# Altium PCB EVO373.PcbDoc
Units mm, origin at the board's own origin, x right, y up, seen from the top; angles counter-clockwise.
Board outline 40 x 55 mm, 2 copper layers (Top Layer, Bottom Layer), stack 1.571 mm thick; 33 components, 49 nets, 176 pads, 18 vias.
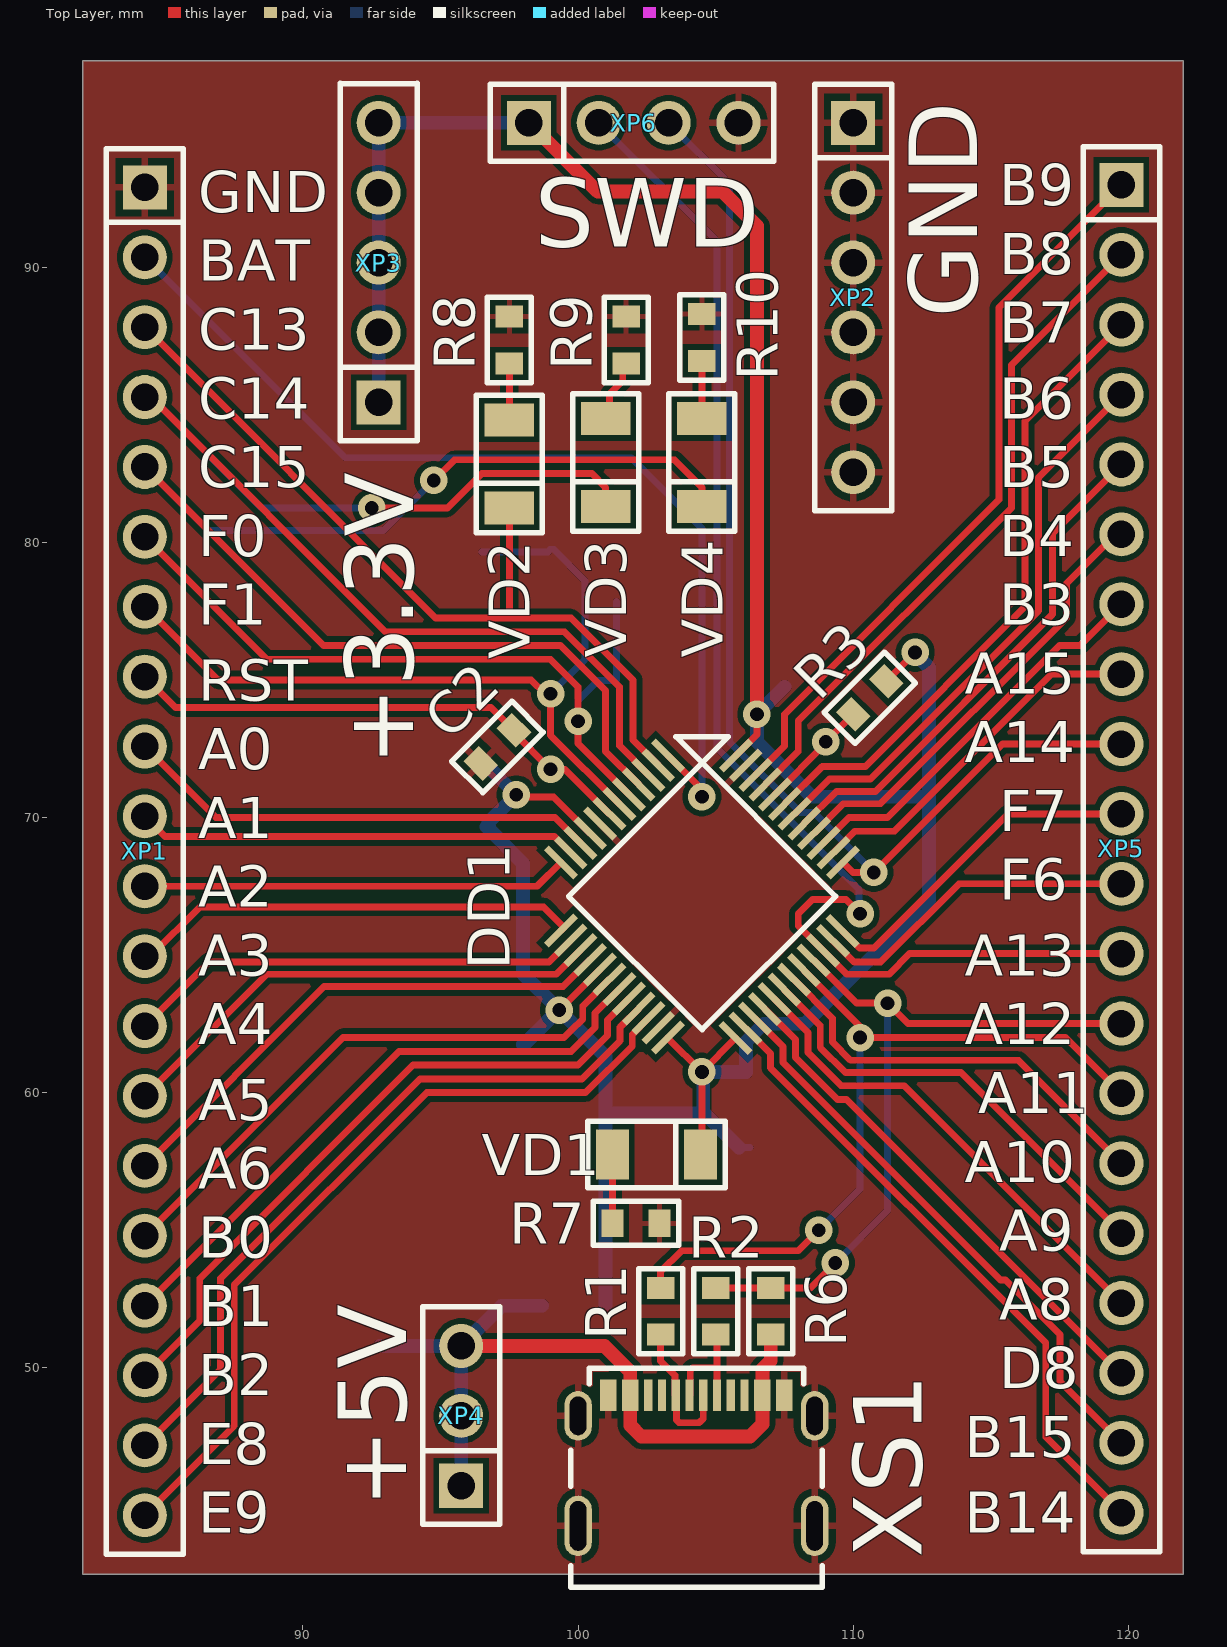
[diagram p0: Top Layer view]
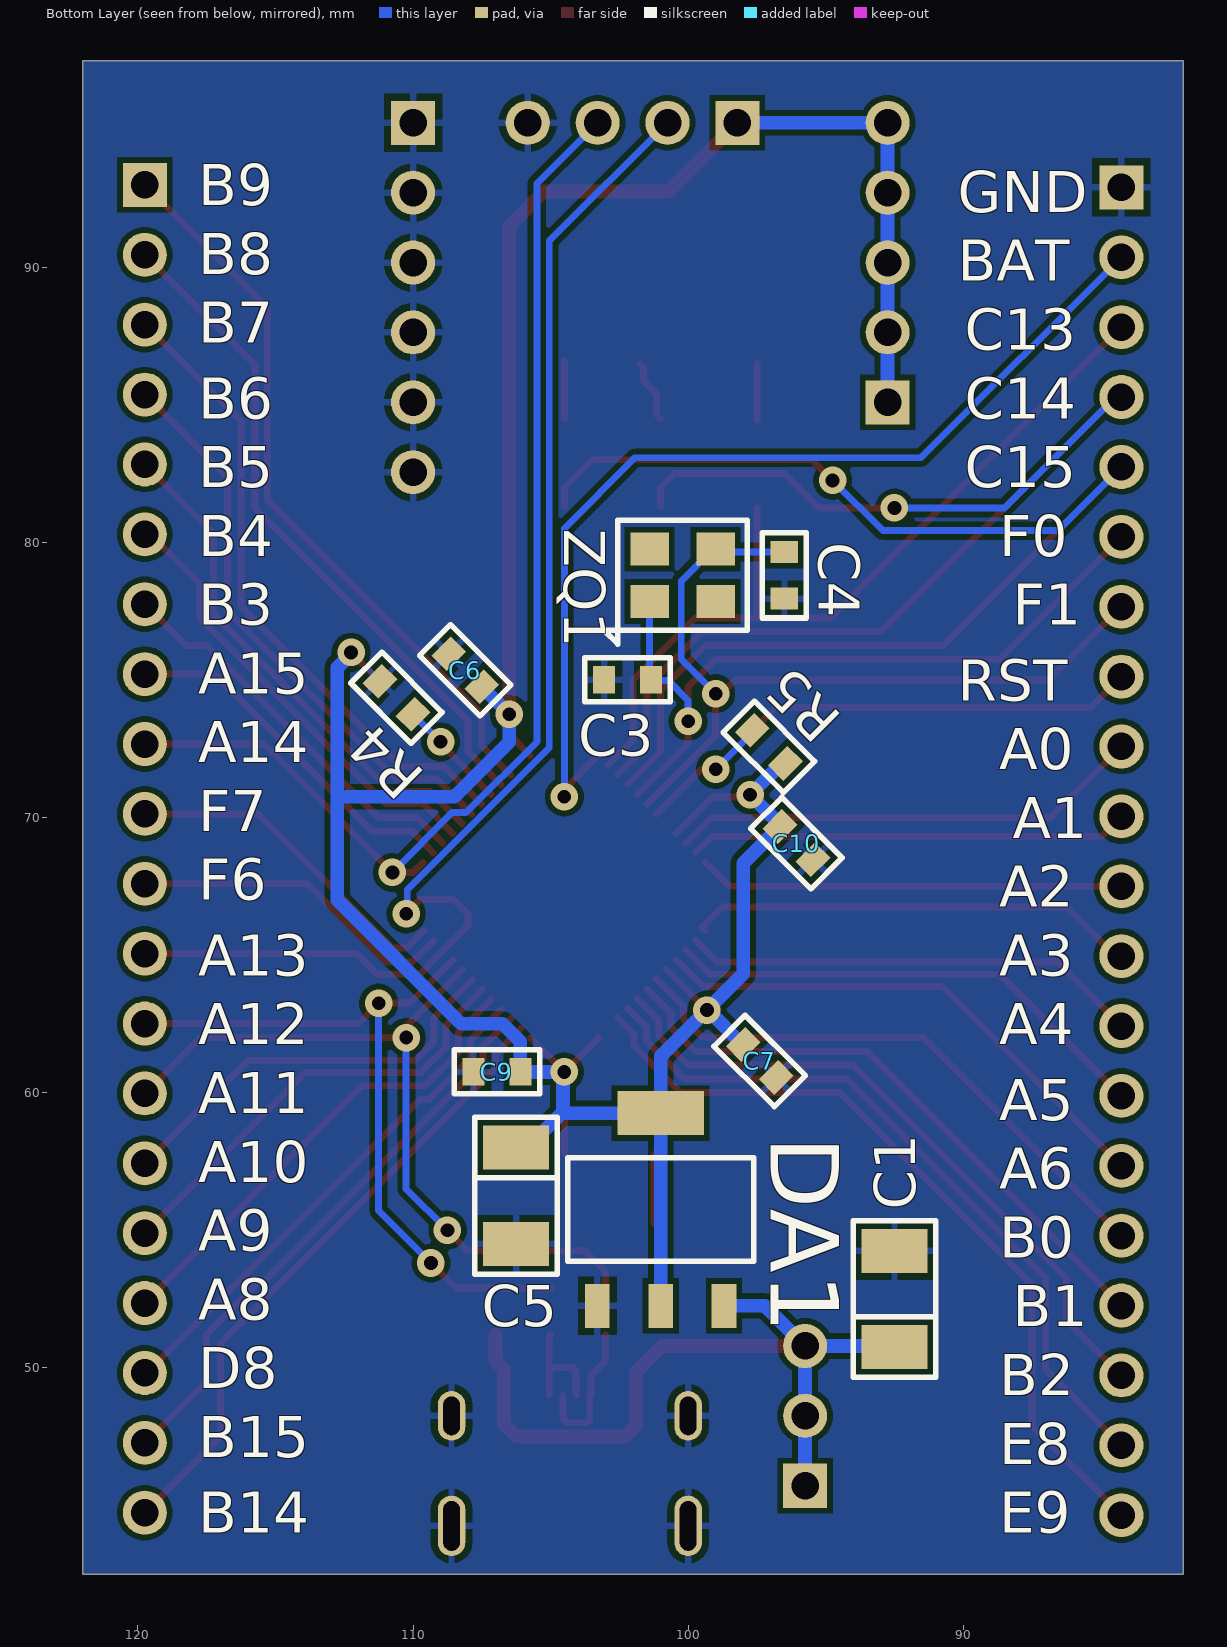
[diagram p1: Bottom Layer view, seen from below]
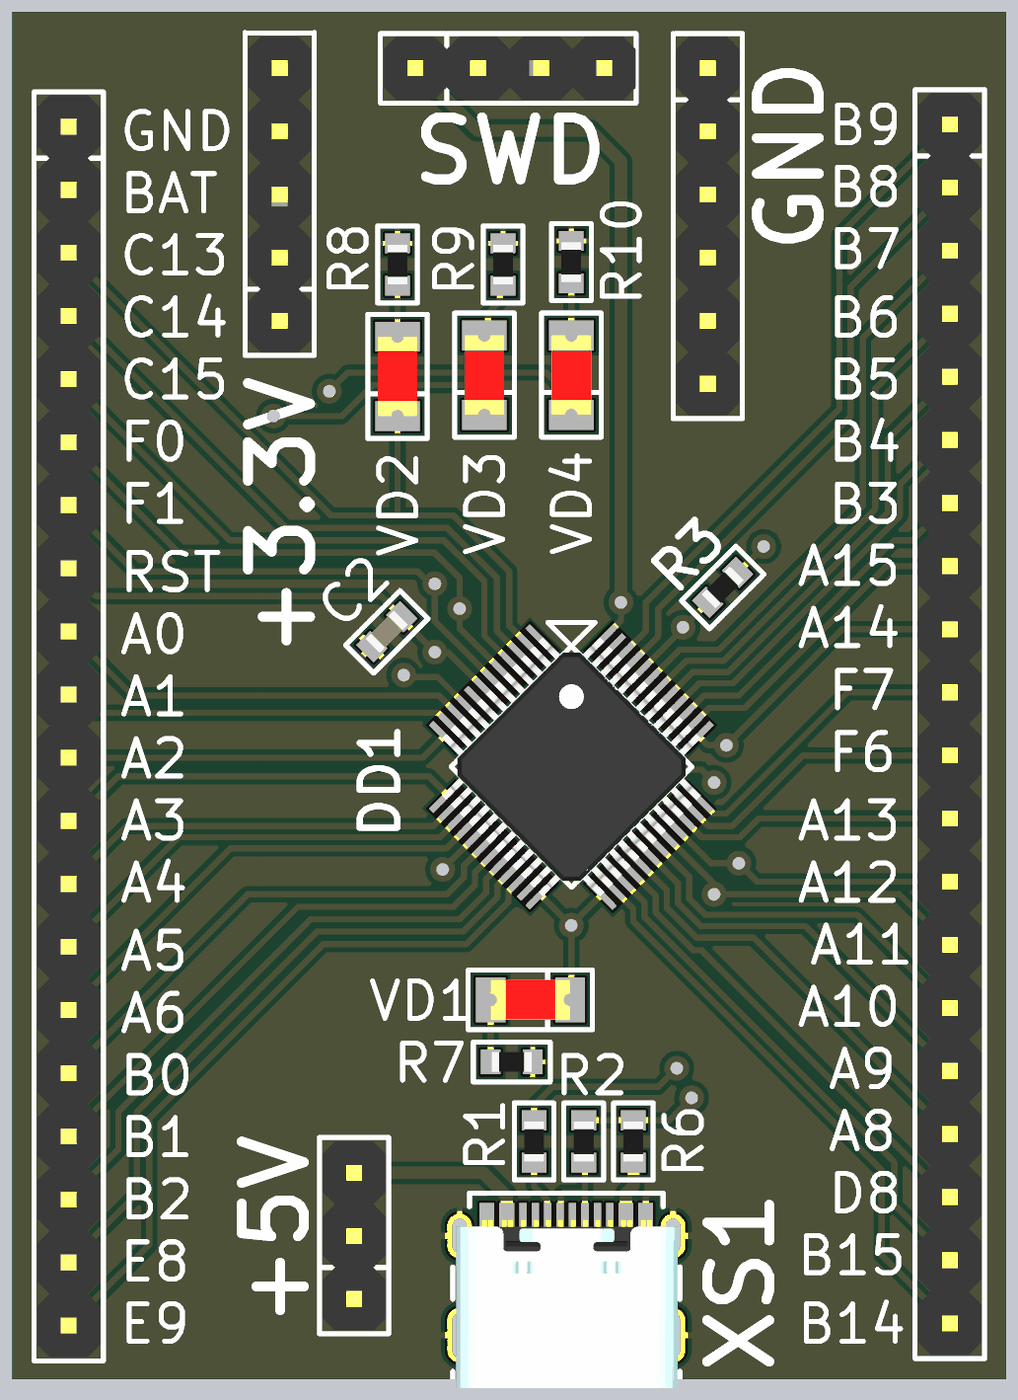
[diagram p2: 3D render of the assembled board from above, using the file's embedded part models]
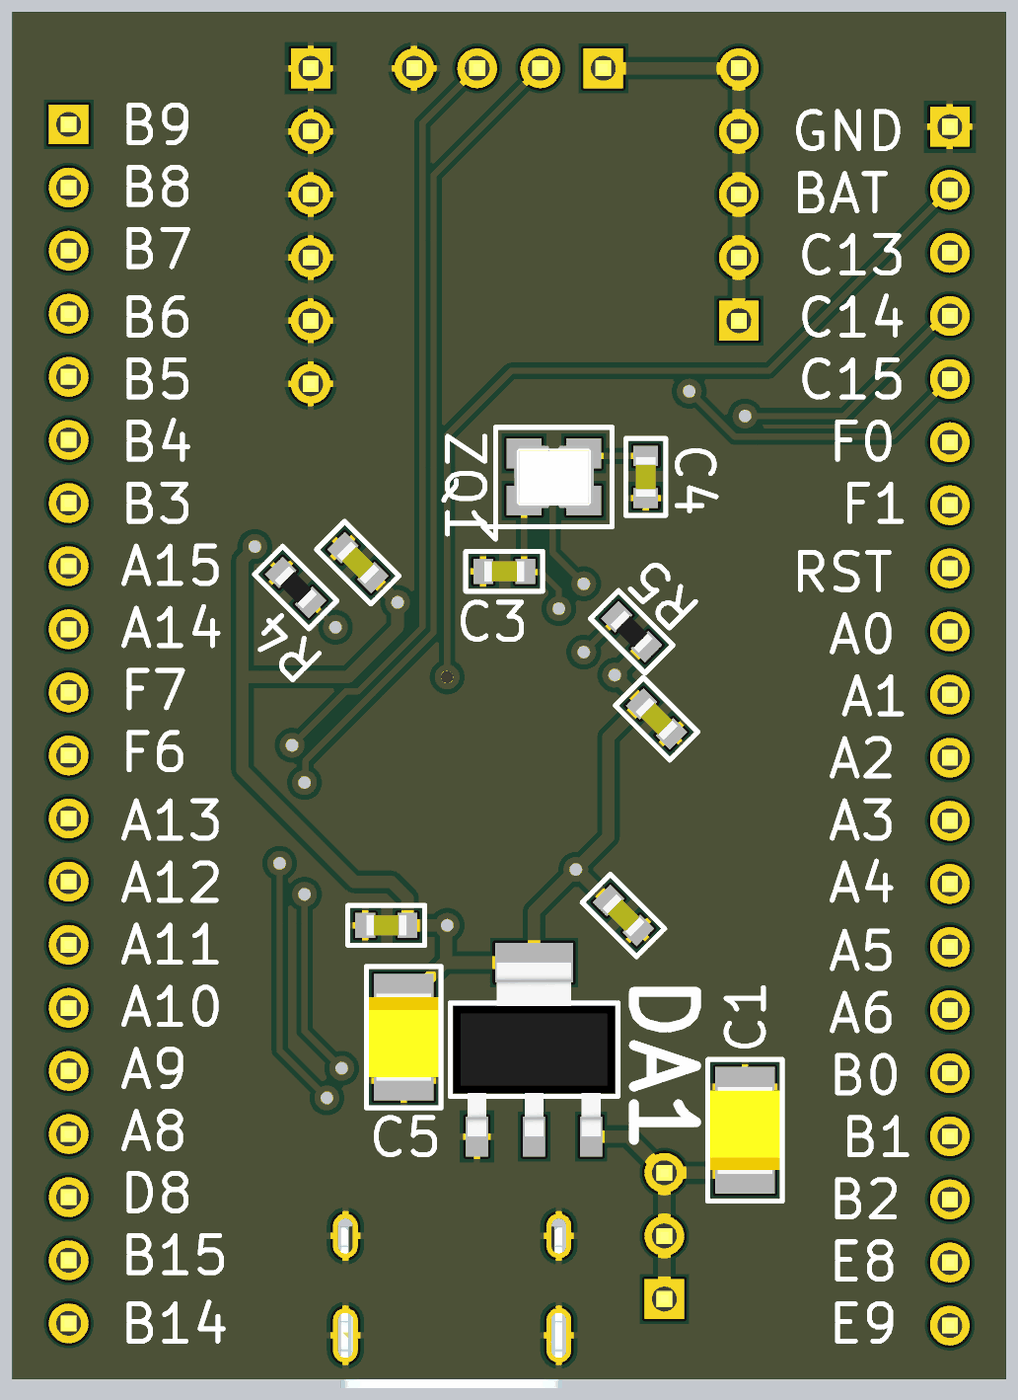
[diagram p3: 3D render of the assembled board from below, using the file's embedded part models]

## Layer stack, top to bottom
Top Solder: solder mask 0.0102, Solder Resist, Dk 3.5
Top Layer: signal copper 0.0356
Dielectric 1: dielectric 1.5, FR-4, Dk 4.8
Bottom Layer: signal copper 0.0356
Bottom Solder: solder mask 0.0102, Solder Resist, Dk 3.5

## Board outline
82,42.5 122,42.5 122,97.5 82,97.5

## Design rules (kind name [scope] priority, off if disabled: settings)
Clearance [All] p1: gap=0.2 ignorepadtopadclearanceinfootprint=FALSE except(0: Arc-Hole Track-Hole SMDPad-Hole THPad-Hole Via-Hole Fill-Hole Poly-Hole Region-Hole Text-Hole)
PolygonConnect [All] p1: connectstyle=Relief reliefconductorwidth=0.254 reliefentries=4 polygonreliefangle="90 Angle" airgapwidth=0.254
RoutingVias [All] p1: holewidth=0.5 width=1 viastyle="Through Hole" minholewidth=0.2 minwidth=0.8 maxholewidth=0.711 maxwidth=1.27
SolderMaskExpansion [All] p1: expansion=0.102 istentingtop=FALSE
UnRoutedNet [All] p1: checkbadconnections=TRUE
Width [All] p1: maxlimit=0.5 minlimit=0.2 preferedwidth=0.25 minimp=50.000000 maximp=50.000000 favimp=50.000000
29 further rules are at their usual default settings.

## Components (designator, comment, footprint, x,y, rotation, side; value= is the part's Value field where it differs from the comment)
C1 "10x16" CAP-TYPEB 92.5,50.75 r90 bottom
C2 "0.1" CAP-CHIP0603 96.5,72 r45 top
C3 "22" CAP-CHIP0603 103,75 r180 bottom
C4 "22" CAP-CHIP0603 96.5,78 r90 bottom
C5 "10x16" CAP-TYPEB 106.25,58 r270 bottom
C6 "0.1" CAP-CHIP0603 108.667,75.917 r225 bottom
C7 "0.1" CAP-CHIP0603 96.833,60.583 r45 bottom
C9 "0.01" CAP-CHIP0603 107.75,60.75 r180 bottom
C10 "0.01" CAP-CHIP0603 95.5,68.5 r45 bottom
DA1 "ADP3338AKC-3.3" SOT223 103.3,52.25 r180 bottom
DD1 "STM32F373C8T7" QFP-48-7x7 103.268,72.254 r315 top
R1 "20" RES-CHIP0603 103,51.25 r90 top
R2 "20" RES-CHIP0603 105,51.25 r90 top
R3 "1M" RES-CHIP0603 111.167,74.917 r225 top
R4 "10K" RES-CHIP0603 111.167,74.917 r225 bottom
R5 "1M" RES-CHIP0603 96.5,72 r45 bottom
R6 "4.7K" RES-CHIP0603 107,51.25 r90 top
R7 "510" RES-CHIP0603 102.9,55.25 r180 top
R8 "510" RES-CHIP0603 97.5,88.15 r270 top
R9 "510" RES-CHIP0603 101.75,88.15 r270 top
R10 "510" RES-CHIP0603 104.5,88.25 r270 top
VD1 "KP-3216EC" LED1206 104.45,57.75 r180 top
VD2 "KP-3216YC" LED1206 97.5,81.25 r90 top
VD3 "KP-3216SGC" LED1206 101,81.3 r90 top
VD4 "KP-3216MBC" LED1206 104.5,81.3 r90 top
XP1 "PLS-20" PLS-20S 84.25,92.9 r270 top
XP2 "GND" PLS-6S 110,95.25 r270 top
XP3 "+3.3V" PLS-5S 92.75,85.09 r90 top
XP4 "+5V" PLS-3S 95.75,45.71 r90 top
XP5 "PLS-20" PLS-20S 119.75,92.99 r270 top
XP6 "SWD" PLS-4S 98.21,95.25 r0 top
XS1 "2171790001" 2171790001 101.1,49 r0 top
ZQ1 "8MHz" ZQ-3225 101.4,77.85 r180 bottom

## Footprints (in the part's own frame and the unit in brackets; to place one, negate y for a bottom-side part, rotate by r counter-clockwise, add the part's x,y. Pads: shape width x height; smd on the part's side, far side on the other; paste and mask are expansions set on the pad)
2171790001 [mm] "USB TypeC USB2.0compatible"
  rect 0.6x1.15 smd: 1(0,0) 2(0.8,0) 11(5.6,0) 12(6.4,0)
  rect 0.3x1.15 smd: 3(1.45,0) 4(1.95,0) 5(2.45,0) 6(2.95,0) 7(3.45,0) 8(3.95,0) 9(4.45,0) 10(4.95,0)
  oval 1x2.2 hole 0.6 slot 1.8 at 90 deg: 13(-1.1,-4.75) 13(7.5,-4.75)
  oval 1x1.8 hole 0.6 slot 1.4 at 90 deg: 13(-1.1,-0.75) 13(7.5,-0.75)
  silkscreen extent -1.38,-6.98 7.78,0.97, body extent -1.24,-6.88 7.7,-0.12, height 3.26
CAP-CHIP0603 [mm] "Chip Capacitor 0603 E24"
  rect 0.8x1 smd: 1(-0.05,0) 2(1.65,0)
  silkscreen extent -0.75,-0.8 2.35,0.8, body extent 0,-0.4 1.6,0.4, height 0.46
CAP-TYPEB [mm] "Tantalum Chip Capacitor of TypeB (EIA 3528) case"
  rect 1.6x2.4 smd: 1(0,0) 2(3.5,0)
  silkscreen extent -1.1,-1.5 4.6,1.5, body extent 0,-1.4 3.5,1.4, height 1.9
LED1206 [mm] "Chip LED 1206"
  rect 1.2x1.8 smd: 1(0,0) 2(3.2,0)
  silkscreen extent -0.9,-1.2 4.1,1.2, body extent 0,-0.8 3.2,0.8, height 0.75
PLS-3S [mm] "Plug 3pin 2.54mm pitch"
  rect 1.6x1.6 / inner rect 1.5x1.5 / far side rect 1.6x1.6 hole 1: 1(0,0)
  round 1.6 / inner round 1.5 / far side round 1.6 hole 1: 2(2.54,0) 3(5.08,0)
  silkscreen extent -1.4,-1.4 6.5,1.4, body extent -1.27,-1.27 6.35,1.27, height 8.5
PLS-4S [mm] "Plug 4pin 2.54mm pitch"
  rect 1.6x1.6 / inner rect 1.5x1.5 / far side rect 1.6x1.6 hole 1: 1(0,0)
  round 1.6 / inner round 1.5 / far side round 1.6 hole 1: 2(2.54,0) 3(5.08,0) 4(7.62,0)
  silkscreen extent -1.4,-1.4 8.9,1.4, body extent -1.27,-1.27 8.89,1.27, height 8.5
PLS-5S [mm] "Plug 3pin 2.54mm pitch"
  rect 1.6x1.6 / inner rect 1.5x1.5 / far side rect 1.6x1.6 hole 1: 1(0,0)
  round 1.6 / inner round 1.5 / far side round 1.6 hole 1: 2(2.54,0) 3(5.08,0) 4(7.62,0) 5(10.16,0)
  silkscreen extent -1.4,-1.4 11.6,1.4, body extent -1.27,-1.27 11.43,1.27, height 8.5
PLS-6S [mm] "Plug 6pin 2.54mm pitch"
  rect 1.6x1.6 / inner rect 1.5x1.5 / far side rect 1.6x1.6 hole 1: 1(0,0)
  round 1.6 / inner round 1.5 / far side round 1.6 hole 1: 2(2.54,0) 3(5.08,0) 4(7.62,0) 5(10.16,0) 6(12.7,0)
  silkscreen extent -1.4,-1.4 14.1,1.4, body extent -1.27,-1.27 13.97,1.27, height 8.5
PLS-20S [mm] "Plug 20pin 2.54mm pitch"
  rect 1.6x1.6 / inner rect 1.5x1.5 / far side rect 1.6x1.6 hole 1: 1(0,0)
  round 1.6 / inner round 1.5 / far side round 1.6 hole 1: 2(2.54,0) 3(5.08,0) 4(7.62,0) 5(10.16,0) 6(12.7,0) 7(15.24,0) 8(17.78,0) 9(20.32,0) 10(22.86,0) 11(25.4,0) 12(27.94,0) 13(30.48,0) 14(33.02,0) 15(35.56,0) 16(38.1,0) 17(40.64,0) 18(43.18,0) 19(45.72,0) 20(48.26,0)
  silkscreen extent -1.4,-1.4 49.68,1.4, body extent -1.27,-1.27 49.53,1.27, height 8.5
QFP-48-7x7 [mm] "Thin QFP 7x7mm body 0.5mm pitch"
  rect 1.5x0.25 smd: 1(0,0) 2(0,-0.5) 3(0,-1) 4(0,-1.5) 5(0,-2) 6(0,-2.5) 7(0,-3) 8(0,-3.5) 9(0,-4) 10(0,-4.5) 11(0,-5) 12(0,-5.5) 25(9,-5.525) 26(9,-5.025) 27(9,-4.525) 28(9,-4.025) 29(9,-3.525) 30(9,-3.025) 31(9,-2.525) 32(9,-2.025) 33(9,-1.525) 34(9,-1.025) 35(9,-0.525) 36(9,-0.025)
  rect 0.25x1.5 smd: 13(1.75,-7.25) 14(2.25,-7.25) 15(2.75,-7.25) 16(3.25,-7.25) 17(3.75,-7.25) 18(4.25,-7.25) 19(4.75,-7.25) 20(5.25,-7.25) 21(5.75,-7.25) 22(6.25,-7.25) 23(6.75,-7.25) 24(7.25,-7.25) 37(7.25,1.75) 38(6.75,1.75) 39(6.25,1.75) 40(5.75,1.75) 41(5.25,1.75) 42(4.75,1.75) 43(4.25,1.75) 44(3.75,1.75) 45(3.25,1.75) 46(2.75,1.75) 47(2.25,1.75) 48(1.75,1.75)
  silkscreen extent -0.28,-6.17 7.92,2.03, body extent 0,-7.25 9,1.75, height 1.71
RES-CHIP0603 [mm] "Chip Resistor 0603 E24"
  rect 0.8x1 smd: 1(-0.05,0) 2(1.65,0)
  silkscreen extent -0.75,-0.8 2.35,0.8, body extent 0,-0.4 1.6,0.4, height 0.46
SOT223 [mm] "SOT223 case"
  rect 0.9x1.6 smd: 1(0,0) 2(2.3,0) 3(4.6,0)
  rect 3.15x1.6 smd: 2(2.3,7)
  silkscreen extent -1.08,1.62 5.69,5.38, body extent -0.95,0 5.55,7, height 1.6
ZQ-3225 [mm] "Generator 4pin 3.2x2.5mm"
  rect 1.4x1.2 smd: 1(0,0) 2(2.4,0) 3(2.4,1.9) 4(0,1.9)
  silkscreen extent -1.65,-1.55 3.55,2.95, body extent -0.4,-0.3 2.8,2.2, height 1.05

## Part data
C1 C5: library part CAP-TypeB, "Tantalum Capacitor TypeB size", Manufacturer=KEMET, FullName=T491BxxxKxxxAT, TY=АЖЯР.673546.007ТУ
C2 C3 C4 C6 C7 C9 C10: library part CAP-NP0-0603, "Chip Capacitor NP0 (C0G) 0603 size", Manufacturer=KEMET, FullName=C0603CxxxJxGACT, TY=АЖЯР.673511.004ТУ
DA1: "LDO linear 3.3V regulator", Manufacturer="Analog Devices", ChipDip=8046220726, FullName=ADP3338AKC-3.3
DD1: "Cortex-M4, 12bit ADC, 12bit DAC, RTC, CAN, USB", Manufacturer="ST Microelectronics", ChipDip=9000237665, FullName=STM32F373C8T7
R1 R2 R3 R4 R5 R6 R7 R8 R9 R10: library part CHIP-0603-E24, "Chip resistor 0603 E24 tolerance", Manufacturer=Bourns, FullName=CR0603-JW-, TY="ШКАБ.434110.002 ТУ"
VD1: "Red LED Chip 1206", Manufacturer=Kingbright, ChipDip=8008595251, FullName=KP-3216EC
VD2: "Yellow LED Chip 1206", Manufacturer=Kingbright, ChipDip=8001937240, FullName=KP-3216YC
VD3: "Green LED Chip 1206", Manufacturer=Kingbright, ChipDip=8001779374, FullName=KP-3216SGC
VD4: "Blue LED Chip 1206", Manufacturer=Kingbright, ChipDip=8001946453, FullName=KP-3216MBC
XP1 XP5: "Plug 24pin 2mm pitch", Manufacturer=Connfly, ChipDip=379650257, FullName=DS1021-1*20
XP2: library part PLS-6, "Plug 6pin 2mm pitch", Manufacturer=Connfly, ChipDip=389965514, FullName=DS1021-1*6
XP3: library part PLS-5, "Plug 5pin 2mm pitch", Manufacturer=Connfly, ChipDip=707998901, FullName=DS1021-1*5
XP4: library part PLS-3, "Plug 3pin 2.54mm pitch", Manufacturer=Connfly, ChipDip=132511368, FullName=DS1021-1*3
XP6: library part PLS-4, "Plug 4pin 2mm pitch", Manufacturer=Connfly, ChipDip=174993133, FullName=DS1021-1*4
XS1: "Horizontal USB TypeC USB 2.0 compatible socket", Manufacturer=Molex, ChipDip=8008902888, FullName=2171790001
ZQ1: library part ZQ-3225, "SMD quartz generator 3.2x2/5mm", FullName=SMX, TY={TY}

## Via types
v1: diameter 1/1 (per signal layer), hole 0.5, Top Layer to Bottom Layer, tented both sides, 18 vias

## Nets (pads, with @x,y where several pads share a name; then routed paths per layer and width w, separated by ;. In a path a pad name is that pad's centre, name@x,y a point inside that pad or via, vN(x,y) a via of type N, cw(c..) or ccw(c..) an arc to the next point about the centre after c; other vN are vias at no path point)
3V3: C5.1 C6.2 C7.2 C9.2 C10.2 DA1.2 DD1.9 DD1.17 DD1.24 DD1.25 DD1.48 R3.1 R5.1 VD1.1 XP3.1 XP3.2 XP3.3 XP3.4 XP3.5 XP6.1 | length 120.4
  Top Layer w0.25: v1(97.75,70.825) 97.825,70.75 99.115,70.75 DD1.9 ; v1(99.317,63) DD1.17 ; DD1.24 103.258,61.992 v1(104.5,60.75) ; VD1.1 104.5,57.8 v1(104.5,60.75) ; DD1.25 105.729,61.979 v1(104.5,60.75) ; DD1.48 106.5,73.011 v1(106.5,73.75) ; R3.1@111.035,75.285 111.174,75.147 111.397,75.147 v1(112.25,76)
  Top Layer w0.5: XP6.1 100.71,92.75 105.25,92.75 106.5,91.5 v1(106.5,73.75)
  Bottom Layer w0.25: v1(104.5,60.75) v1@104.55,60.75 ; 104.55,59.25 104.6,59.25 ; C5.1@105.85,58 C5.1
  Bottom Layer w0.5: XP3.1 XP3.2 XP3.3 XP3.4 XP3.5 XP6.1 ; R5.1 96.61,71.965 v1(97.75,70.825) 96.735,69.81 96.735,69.7 C10.2@96.773,69.662 ; C10.2 98,68.333 98,64.317 v1(99.317,63) ; C7.2 98.034,61.75 99.284,63 v1(99.317,63) ; DA1.2@101,52.25 DA1.2@101,59.25 ; 104.6,59.25 C5.1@105.85,58 ; C6.2 v1(106.5,73.75) 106.5,72.75 108.5,70.75 112.75,70.75 ; v1(112.25,76) 112.25,75.957 112.75,75.457 112.75,70.75 ; v1(99.317,63) 101,61.317 DA1.2@101,59.25 ; DA1.2@101,59.25 104.55,59.25 104.55,60.75 C9.2 106.1,61.85 106.75,62.5 108.25,62.5 112.75,67 112.75,70.75
+5: C1.1 DA1.3 R6.1 XP4.1 XP4.2 XP4.3 XS1.2 XS1.11 | length 28.7
  Top Layer w0.5: XP4.3 100.96,50.79 101.9,49.85 XS1.2 101.9,47.896 102.296,47.5 106.25,47.5 106.7,47.95 XS1.11 106.7,49.95 107,50.25 R6.1
  Bottom Layer w0.25: C1.1@92.75,50.75 C1.1@92.79,50.79
  Bottom Layer w0.5: C1.1@92.79,50.79 XP4.3 97.21,52.25 DA1.3 ; XP4.1@95.75,45.46 XP4.1 XP4.2 XP4.3@95.75,50.54
BAT: DD1.1 XP1.2 | length 36.1
  Top Layer w0.25: DD1.1 104.5,71.022 v1(104.5,70.75)
  Bottom Layer w0.25: XP1.2 91.535,83.075 101.925,83.075 104.5,80.5 v1(104.5,70.75)
GND: C1.2 C2.1 C3.1 C4.1 C5.2 C6.1 C7.1 C9.1 C10.1 DA1.1 DD1.8 DD1.23 DD1.47 R4.1 R7.1 R8.1 R9.1 R10.1 XP1.1 XP2.1 XP2.2 XP2.3 XP2.4 XP2.5 XP2.6 XP6.4 XS1.1 XS1.12 XS1.13
NetDD1_44: DD1.44 R3.2 R4.2 | length 5.6
  Top Layer w0.25: DD1.44 109,72.683 v1(109,72.75) 109.889,73.639 109.889,73.778 R3.2@109.833,73.833
  Bottom Layer w0.25: v1(109,72.75) R4.2
NetR1_1: R1.1 XS1.5 XS1.7 | length 5.3
  Top Layer w0.25: R1.1 103,50.25 103.525,49.725 103.525,49.025 XS1.5 103.575,48.975 103.575,48.096 103.671,48 104.404,48 104.55,48.146 XS1.7
NetR2_1: R2.1 XS1.6 XS1.8 | length 4.2
  Top Layer w0.25: XS1.6 104.075,49.025 104.075,49.904 104.171,50 104.975,50 105.05,50.075 ; R2.1 105.05,51.15 105.05,50.075 ; XS1.8 105.05,50.075
NetR7_2: R7.2 VD1.2 | length 2.5
  Top Layer w0.25: R7.2 VD1.2
NetR8_2: R8.2 VD2.2 | length 2
  Top Layer w0.25: VD2.2 R8.2
NetR9_2: R9.2 VD3.2 | length 2.3
  Top Layer w0.25: VD3.2 101.146,84.646 101.146,85.396 101.621,85.871 101.621,86.371 R9.2
NetR10_2: R10.2 VD4.2 | length 2.1
  Top Layer w0.25: VD4.2 R10.2
NRST: C2.2 DD1.7 R5.2 XP1.8 | length 21
  Top Layer w0.25: XP1.8 85.37,74 96.833,74 C2.2 ; C2.2@97.625,73.125 v1(99,71.75) 99.529,71.75 DD1.7
  Bottom Layer w0.25: R5.2 97.667,73.083 v1(99,71.75)
PA0: DD1.10 XP1.9 | length 17.3
  Top Layer w0.25: XP1.9 86.83,70 99.158,70 DD1.10
PA1: DD1.11 XP1.10 | length 16
  Top Layer w0.25: XP1.10 84.981,69.309 99.142,69.309 DD1.11
PA2: DD1.12 XP1.11 | length 15.5
  Top Layer w0.25: XP1.11 98.5,67.5 99.372,68.372 DD1.12
PA3: DD1.13 XP1.12 | length 16.5
  Top Layer w0.25: XP1.12 84.46,64.96 86.25,66.75 98.75,66.75 99.494,66.006 DD1.13
PA4: DD1.14 XP1.13 | length 16.8
  Top Layer w0.25: XP1.13 86.58,64.75 98.946,64.75 DD1.14
PA5: DD1.15 XP1.14 | length 18
  Top Layer w0.25: XP1.14 88.67,64.3 99.203,64.3 DD1.15
PA6: DD1.16 XP1.15 | length 19.3
  Top Layer w0.25: XP1.15 90.76,63.85 99.46,63.85 DD1.16
PA8: DD1.29 XP5.17 | length 17.6
  Top Layer w0.25: DD1.29 108.35,62.187 108.35,61.46 109.56,60.25 111.85,60.25 XP5.17
PA9: DD1.30 XP5.16 | length 16.4
  Top Layer w0.25: DD1.30 108.8,62.444 108.8,61.647 109.722,60.725 113.915,60.725 XP5.16
PA10: DD1.31 XP5.15 | length 15.2
  Top Layer w0.25: DD1.31 109.25,62.701 109.25,61.833 109.908,61.175 116.005,61.175 XP5.15
PA11/U-: DD1.32 R1.2 XP5.14 | length 28.2
  Top Layer w0.25: R1.2 103,53.5 103.75,54.25 108,54.25 v1(108.75,55) ; DD1.32 110.25,62.408 v1(110.25,62) 117.72,62 XP5.14
  Bottom Layer w0.25: v1(108.75,55) 110.25,56.5 v1(110.25,62)
PA12/U+: DD1.33 R2.2 R6.2 XP5.13 | length 27.1
  Top Layer w0.25: R2.2 R6.2 108.441,52.9 v1(109.347,53.806) ; DD1.33 110.115,63.25 v1(111.25,63.25) 111.99,62.51 XP5.13
  Bottom Layer w0.25: v1(109.347,53.806) 111.25,55.709 v1(111.25,63.25)
PA13/PGD: DD1.34 XP5.12 XP6.2 | length 48.6
  Top Layer w0.25: v1(110.25,66.5) 110.25,66.517 109.743,67.024 108.524,67.024 108,66.5 108,66.072 DD1.34 109.772,64.3 111.3,64.3 112.05,65.05 XP5.12
  Bottom Layer w0.25: XP6.2 105.05,90.95 105.05,72.533 110.208,67.375 110.208,66.542 v1(110.25,66.5)
PA14/PGC: DD1.37 XP5.9 XP6.3 | length 42.8
  Top Layer w0.25: DD1.37 109.997,68 v1(110.75,68) 115.42,72.67 XP5.9
  Bottom Layer w0.25: XP6.3 105.5,93.04 105.5,72.75 108.075,70.175 108.575,70.175 v1(110.75,68)
PA15: DD1.38 XP5.8 | length 13.2
  Top Layer w0.25: DD1.38 110.06,69.5 111.5,69.5 117.21,75.21 XP5.8
PB0: DD1.18 XP1.16 | length 21
  Top Layer w0.25: XP1.16 91.45,62 99.484,62 99.734,62.25 99.75,62.25 100.17,62.67 100.17,63.146 DD1.18
PB1: DD1.19 XP1.17 | length 22.3
  Top Layer w0.25: XP1.17 93.49,61.5 99.75,61.5 100.62,62.37 100.62,62.889 DD1.19
PB2: DD1.20 XP1.18 | length 24.5
  Top Layer w0.25: XP1.18 86.25,51.72 86.25,53.25 94,61 100,61 101.07,62.07 101.07,62.632 DD1.20
PB3: DD1.39 XP5.7 | length 14.4
  Top Layer w0.25: DD1.39 109.853,70 111.25,70 117.5,76.25 118.25,76.25 XP5.7
PB4: DD1.40 XP5.6 | length 16.4
  Top Layer w0.25: DD1.40 109.646,70.5 111,70.5 117.75,77.25 117.75,78.5 119.54,80.29 XP5.6
PB5: DD1.41 XP5.5 | length 18.7
  Top Layer w0.25: DD1.41 109.388,70.95 110.814,70.95 117.25,77.386 117.25,80.33 XP5.5
PB6: DD1.42 XP5.4 | length 21
  Top Layer w0.25: DD1.42 109.131,71.4 110.627,71.4 116.739,77.511 116.739,82.359 XP5.4
PB7: DD1.43 XP5.3 | length 23.4
  Top Layer w0.25: DD1.43 108.874,71.85 110.441,71.85 116.25,77.659 116.25,84.41 XP5.3
PB8/CRX: DD1.45 XP5.2 | length 24.6
  Top Layer w0.25: DD1.45 108,72.39 108,73.5 115.75,81.25 115.75,86.45 XP5.2
PB9/CTX: DD1.46 XP5.1 | length 27
  Top Layer w0.25: DD1.46 107.5,72.597 107.5,73.75 115.3,81.55 115.3,88.54 XP5.1
PB14: DD1.26 XP5.20 | length 23.3
  Top Layer w0.25: DD1.26 107,61.415 107,60.901 117,50.901 117,47.48 XP5.20
PB15: DD1.27 XP5.19 | length 21
  Top Layer w0.25: DD1.27 107.45,61.672 107.45,61.088 115.356,53.182 115.535,53.182 117.514,51.204 117.514,49.506 XP5.19
PC13: DD1.2 VD2.1 XP1.3 | length 30.5
  Top Layer w0.25: XP1.3 94.82,77.25 97.5,77.25 ; VD2.1 97.5,77.25 ; DD1.2 102,72.815 102,75 99.75,77.25 97.5,77.25
PC14: DD1.3 VD3.1 XP1.4 | length 45.1
  Top Layer w0.25: XP1.4 84.47,85.28 93,76.75 99.5,76.75 101.5,74.75 101.5,72.608 DD1.3 ; v1(92.5,81.25) 95.25,81.25 96.5,82.5 100.5,82.5 101,82 VD3.1
  Bottom Layer w0.25: XP1.4 84.47,85.28 88.5,81.25 v1(92.5,81.25)
PC15: DD1.4 VD4.1 XP1.5 | length 47.4
  Top Layer w0.25: XP1.5 90.74,76.25 99.364,76.25 101,74.614 101,72.4 DD1.4 ; v1(94.75,82.25) 95.5,83 103.5,83 104.5,82 VD4.1
  Bottom Layer w0.25: XP1.5 86.565,80.425 92.925,80.425 v1(94.75,82.25)
PD8: DD1.28 XP5.18 | length 18.8
  Top Layer w0.25: DD1.28 107.9,61.93 107.9,61.274 109.424,59.75 109.75,59.75 119.69,49.81 XP5.18
PE8: DD1.21 XP1.19 | length 26.8
  Top Layer w0.25: XP1.19 87,49.93 87,53.25 94.25,60.5 100.136,60.5 101.52,61.884 101.52,62.375 DD1.21
PE9: DD1.22 XP1.20 | length 29
  Top Layer w0.25: XP1.20 87.5,47.89 87.5,53 94.5,60 100.273,60 101.97,61.698 101.97,62.118 DD1.22
PF0: C3.2 DD1.5 XP1.6 ZQ1.1 | length 27.9
  Top Layer w0.25: XP1.6 88.7,75.75 99,75.75 100,74.75 v1(100,73.5) 100,72.693 DD1.5
  Bottom Layer w0.25: v1(100,73.5) 100,74.25 100.721,74.971 101.321,74.971 C3.2 ; C3.2@101.4,75 ZQ1.1
PF1: C4.2 DD1.6 XP1.7 ZQ1.3 | length 30
  Top Layer w0.25: XP1.7 86.91,75 98.297,75 98.797,74.5 v1(99,74.5) 99,72.986 DD1.6
  Bottom Layer w0.25: C4.2 98.9,79.65 ZQ1.3 99.1,79.75 100.25,78.6 100.25,75.75 v1(99,74.5)
PF6: DD1.35 XP5.11 | length 12
  Top Layer w0.25: DD1.35 110.029,64.75 111,64.75 113.84,67.59 XP5.11
PF7: DD1.36 XP5.10 | length 12.4
  Top Layer w0.25: DD1.36 110.236,65.25 110.75,65.25 115.63,70.13 XP5.10
pads on no net: XS1.3 XS1.4 XS1.9 XS1.10 ZQ1.2 ZQ1.4

## Polygon pours and split planes (outlines as drawn)
GND on Bottom Layer "GND_L02_P000" (solid, pour order 0): 82,97.5 122,97.5 122,42.5 82,42.5
GND on Top Layer "GND_L01_P001" (solid, pour order 1): 82,97.5 82,42.5 122,42.5 122,97.5

## Silkscreen, mask and mechanical layers (free items; w line width, h text height)
Top Overlay:
  text "B9" at 115.301,92.25 h1.5
  text "GND" at 86.2,92 h1.5
  text "B8" at 115.301,89.75 h1.5
  text "BAT" at 86.2,89.5 h1.5
  text "B7" at 115.301,87.25 h1.5
  text "C13" at 86.2,87 h1.5
  text "C14" at 86.2,84.5 h1.5
  text "B6" at 115.301,84.5 h1.5
  text "C15" at 86.2,82 h1.5
  text "B5" at 115.301,82 h1.5
  text "F0" at 86.2,79.5 h1.5
  text "B4" at 115.301,79.5 h1.5
  text "F1" at 86.2,77 h1.5
  text "B3" at 115.301,77 h1.5
  text "A15" at 114.051,74.5 h1.5
  text "RST" at 86.2,74.25 h1.5
  text "A14" at 114.051,72 h1.5
  text "A0" at 86.2,71.75 h1.5
  text "F7" at 115.301,69.5 h1.5
  text "A1" at 86.2,69.25 h1.5
  text "F6" at 115.301,67 h1.5
  text "A2" at 86.2,66.75 h1.5
  text "A3" at 86.2,64.25 h1.5
  text "A13" at 114.051,64.25 h1.5
  text "A4" at 86.2,61.75 h1.5
  text "A12" at 114.051,61.75 h1.5
  text "A11" at 114.551,59.25 h1.5
  text "A5" at 86.2,59 h1.5
  text "A10" at 114.051,56.75 h1.5
  text "A6" at 86.2,56.5 h1.5
  text "A9" at 115.301,54.25 h1.5
  text "B0" at 86.2,54 h1.5
  text "A8" at 115.301,51.75 h1.5
  text "B1" at 86.2,51.5 h1.5
  text "D8" at 115.301,49.25 h1.5
  text "B2" at 86.2,49 h1.5
  text "B15" at 114.051,46.75 h1.5
  text "E8" at 86.2,46.5 h1.5
  text "E9" at 86.2,44 h1.5
  text "B14" at 114.051,44 h1.5
Bottom Overlay:
  text "B9" at 117.8,92.25 h1.5
  text "GND" at 90.199,92 h1.5
  text "B8" at 117.8,89.75 h1.5
  text "BAT" at 90.199,89.5 h1.5
  text "B7" at 117.8,87.25 h1.5
  text "C13" at 89.949,87 h1.5
  text "C14" at 89.949,84.5 h1.5
  text "B6" at 117.8,84.5 h1.5
  text "C15" at 89.949,82 h1.5
  text "B5" at 117.8,82 h1.5
  text "F0" at 88.699,79.5 h1.5
  text "B4" at 117.8,79.5 h1.5
  text "F1" at 88.199,77 h1.5
  text "B3" at 117.8,77 h1.5
  text "A15" at 117.8,74.5 h1.5
  text "RST" at 90.199,74.25 h1.5
  text "A14" at 117.8,72 h1.5
  text "A0" at 88.699,71.75 h1.5
  text "F7" at 117.8,69.5 h1.5
  text "A1" at 88.199,69.25 h1.5
  text "F6" at 117.8,67 h1.5
  text "A2" at 88.699,66.75 h1.5
  text "A3" at 88.699,64.25 h1.5
  text "A13" at 117.8,64.25 h1.5
  text "A4" at 88.699,61.75 h1.5
  text "A12" at 117.8,61.75 h1.5
  text "A11" at 117.8,59.25 h1.5
  text "A5" at 88.699,59 h1.5
  text "A10" at 117.8,56.75 h1.5
  text "A6" at 88.699,56.5 h1.5
  text "A9" at 117.8,54.25 h1.5
  text "B0" at 88.699,54 h1.5
  text "A8" at 117.8,51.75 h1.5
  text "B1" at 88.199,51.5 h1.5
  text "D8" at 117.8,49.25 h1.5
  text "B2" at 88.699,49 h1.5
  text "B15" at 117.8,46.75 h1.5
  text "E8" at 88.699,46.5 h1.5
  text "E9" at 88.699,44 h1.5
  text "B14" at 117.8,44 h1.5
Top Assembly:
  the board outline again, w0.05
Board:
  the board outline again, w0.05